# Altium PCB Ethernet-Module.PcbDoc (part 2 of 2)
Units mm, origin at the board's own origin, x right, y up, seen from the top; angles counter-clockwise.
Board outline 33 x 53 mm, 2 copper layers (Top Layer, Bottom Layer), stack 0.97 mm thick; 59 components, 47 nets, 237 pads, 62 vias.
Unrouted connection lines stored in the file: 33.
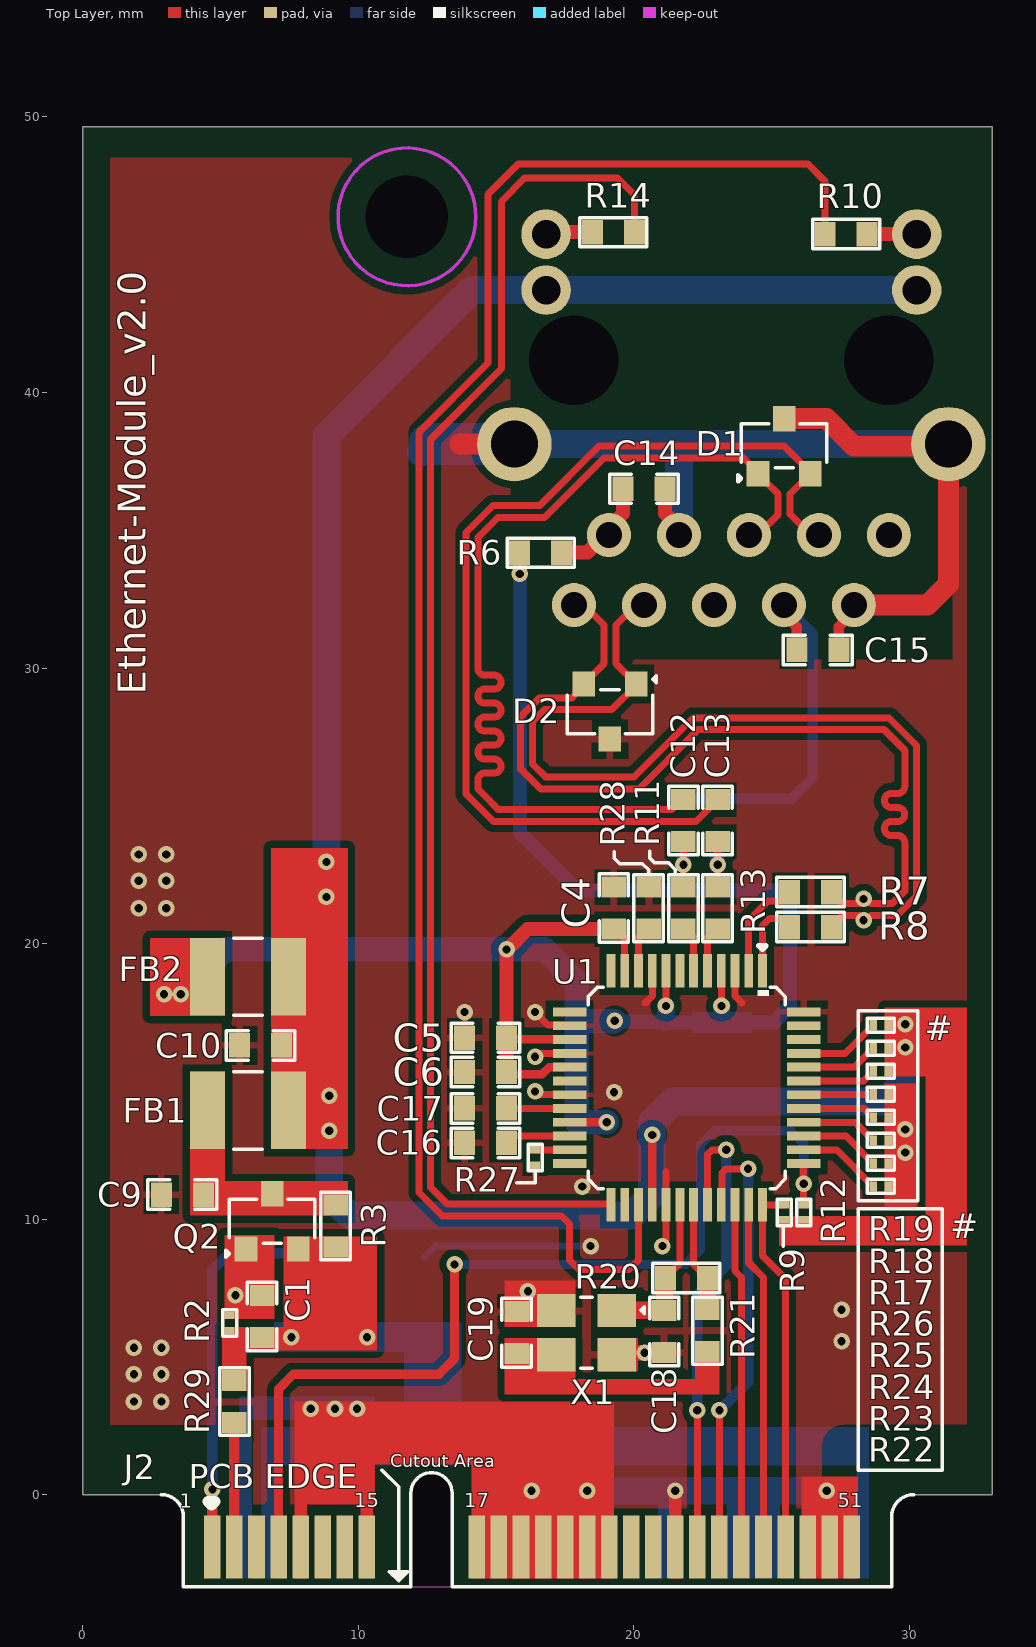
[diagram p0: Top Layer view]

## Via types
v1: diameter 0.6, hole 0.3, Top Layer to Bottom Layer, 62 vias

## Nets (pads, with @x,y where several pads share a name; then routed paths per layer and width w, separated by ;. In a path a pad name is that pad's centre, name@x,y a point inside that pad or via, vN(x,y) a via of type N, cw(c..) or ccw(c..) an arc to the next point about the centre after c; other vN are vias at no path point) (continued)
NetC12_2: C12.2 R11.1 R16.2 | length 2.5
  Top Layer w0.254: R11.1 v1(21.793,22.86) C12.2 C12.2@21.793,23.724
  Bottom Layer w0.508: v1(21.793,22.86) R16.2
NetC13_2: C13.2 R13.1 R15.2 | length 2.5
  Top Layer w0.254: R13.1 v1(23.038,22.86) C13.2 C13.2@23.038,23.724
  Bottom Layer w0.508: v1(23.038,22.86) R15.2
NetC16_2: C16.2 U1.22 | length 2.4
  Top Layer w0.254: C16.2 15.376,12.787 15.605,13.016 U1.22
NetC17_2: C17.2 U1.20 | length 2.3
  Top Layer w0.254: C17.2 U1.20
NetC18_2: C18.2 R20.1 U1.30 X1.1 | length 5.8
  Top Layer w0.254: R20.1 21.138,7.922 21.392,8.176 21.456,8.176 21.665,8.385 U1.30
  Top Layer w0.33: X1.1 X1.1@19.39,6.69 ; C18.2 C18.2@21.118,6.711 ; R20.1@21.118,7.838 R20.1
  Top Layer w0.635: X1.1@19.39,6.69 C18.2 ; C18.2@21.118,6.711 R20.1@21.118,7.838
NetC19_2: C19.2 R21.1 X1.3 | length 1.5
  Top Layer w0.254: C19.2 17.139,5.115 X1.3
NetQ1_1: Q1.1 R30.2
NetQ1_3: Q1.3 R1.2
NetR7_2: R7.2 U1.2 | length 3.8
  Top Layer w0.254: U1.2 24.165,20.844 24.87,21.549 25.391,21.549 25.645,21.803 R7.2
NetR8_2: R8.2 U1.1 | length 2.9
  Top Layer w0.254: U1.1 24.665,20.663 24.915,20.914 25.391,20.914 25.645,20.66 R8.2
NetR11_2: R11.2 U1.6 | length 1.7
  Top Layer w0.254: R11.2 21.857,20.523 22.165,20.215 U1.6
NetR13_2: R13.2 U1.5 | length 1.7
  Top Layer w0.254: U1.5 22.665,20.214 22.974,20.523 R13.2
NetR17_2: R17.2 U1.43 | length 2.7
  Top Layer w0.254: U1.43 28.332,15.016 28.623,15.306 28.673,15.306 28.681,15.314 R17.2
NetR18_2: R18.2 U1.44 | length 2.8
  Top Layer w0.254: U1.44 27.997,15.516 28.623,16.142 28.673,16.142 28.681,16.15 R18.2
NetR19_2: R19.2 U1.45 | length 3
  Top Layer w0.254: U1.45 27.661,16.016 28.623,16.978 28.673,16.978 28.681,16.986 R19.2
NetR20_2: R20.2 R21.2 U1.31 | length 4
  Top Layer w0.254: U1.31 22.165,8.356 22.345,8.176 22.408,8.176 22.662,7.922 R20.2
  Top Layer w0.635: R21.2 R20.2
NetR22_1: R22.1 U1.38 | length 3.1
  Top Layer w0.254: U1.38 26.174,12.506 27.361,12.506 28.623,11.244 28.673,11.244 28.681,11.236 R22.1
NetR23_1: R23.1 U1.39 | length 3
  Top Layer w0.254: U1.39 27.687,13.016 28.623,12.08 28.673,12.08 28.681,12.072 R23.1
NetR24_2: R24.2 U1.40 | length 2.8
  Top Layer w0.254: U1.40 28.023,13.516 28.623,12.916 28.673,12.916 28.681,12.908 R24.2
NetR25_1: R25.1 U1.41 | length 2.7
  Top Layer w0.254: U1.41 28.359,14.016 28.623,13.751 28.673,13.751 28.681,13.743 R25.1
NetR26_1: R26.1 U1.42 | length 2.5
  Top Layer w0.254: U1.42 R26.1@28.681,14.516
NetR27_2: R27.2 U1.23 | length 1.3
  Top Layer w0.254: R27.2@16.409,12.516 U1.23
NetR28_2: R28.2 U1.10 | length 1.7
  Top Layer w0.254: U1.10 20.165,20.221 20.467,20.523 R28.2
RD_N: C13.1 D1.2 J1.3 | length 36.8
  Top Layer w0.254: C13.1 22.974,25.222 22.72,24.968 22.72,24.905 22.543,24.727 22.543,24.715 22.255,24.427 14.902,24.427 13.903,25.425 13.903,34.923 14.881,35.901 16.581,35.901 18.733,38.053 25.447,38.053 26.401,37.099 26.401,36.999 26.118,36.716 26.068,36.716 25.667,36.315 25.667,35.597 26.438,34.826 J1.3
RD_P: C12.1 D1.1 J1.5 | length 36.8
  Top Layer w0.254: C12.1 21.73,25.222 21.366,24.859 15.081,24.859 14.514,25.425 14.335,25.604 14.335,25.933 cw(c14.589,25.933) 14.589,26.187 14.92,26.187 ccw(c14.92,26.441) 14.92,26.695 14.589,26.695 cw(c14.589,26.949) 14.589,27.203 14.92,27.203 ccw(c14.92,27.457) 14.92,27.711 14.589,27.711 cw(c14.589,27.965) 14.589,28.219 14.92,28.219 ccw(c14.92,28.473) 14.92,28.727 14.589,28.727 cw(c14.589,28.981) 14.589,29.235 14.92,29.235 ccw(c14.92,29.489) 14.92,29.743 14.589,29.743 cw(c14.589,29.997) 14.335,29.997 14.335,30.527 14.335,34.744 15.06,35.469 16.76,35.469 18.912,37.621 23.979,37.621 24.784,36.816 24.784,36.716 24.834,36.716 25.235,36.315 25.235,35.574 24.487,34.826 J1.5
TD_N: D2.1 J1.8 R5.1 R8.1 | length 35.8
  Top Layer w0.254: J1.8 20.063,32.286 19.342,31.565 19.342,30.157 19.743,29.756 19.793,29.756 20.076,29.473 D2.1 20.076,29.373 19.193,28.489 16.756,28.489 16.322,28.055 16.322,26.52 16.797,26.046 20,26.046 22.147,28.193 29.261,28.193 30.259,27.195 30.259,25.886 30.259,21.728 29.547,21.015 28.599,21.015 28.426,20.842 v1(28.332,20.842) 28.159,21.015 27.524,21.015 27.169,20.66 R8.1
  Bottom Layer w0.254: R5.1 27.191,20.63 27.589,21.028 28.147,21.028 v1(28.332,20.842)
TD_P: D2.2 J1.10 R4.1 R7.1 | length 35.9
  Top Layer w0.254: J1.10 18.185,32.286 18.727,31.745 18.731,31.745 18.91,31.565 18.91,30.157 18.509,29.756 18.459,29.756 17.893,29.19 17.893,29.07 17.744,28.921 16.578,28.921 15.891,28.234 15.891,26.341 16.618,25.614 20.179,25.614 22.326,27.761 29.082,27.761 29.827,27.016 29.827,26.183 29.827,25.702 cw(c29.573,25.702) 29.573,25.448 29.339,25.448 ccw(c29.339,25.194) 29.339,24.94 29.573,24.94 cw(c29.573,24.686) 29.573,24.432 29.339,24.432 ccw(c29.339,24.178) 29.339,23.924 29.573,23.924 cw(c29.573,23.67) 29.827,23.67 29.827,23.543 29.827,21.907 29.368,21.447 28.599,21.447 28.426,21.62 v1(28.332,21.62) 28.159,21.447 27.524,21.447 27.169,21.803 R7.1
  Bottom Layer w0.254: R4.1 27.191,21.858 27.589,21.46 28.172,21.46 v1(28.332,21.62)
TYPE0: J2.3 R29.1 | length 4.5
  Top Layer w0.381: J2.3 R29.1
VDD: C10.2 C11.2 FB1.2 FB2.1 J1.11 J1.13 R9.1 R12.1 R17.1 R18.1 R19.1 U1.28 | length 73.3
  Top Layer w0.254: U1.28@20.662,10.518 U1.28
  Top Layer w0.305: v1(20.66,13.054) 20.662,13.052 U1.28@20.662,10.518
  Bottom Layer w1.016: v1(8.839,21.692) v1(8.839,22.962) 8.839,38.43 14.125,43.716 J1.13 J1.11 ; v1(8.941,14.481) 8.941,10.879 9.685,10.135 19.916,10.135 20.66,10.879 v1(20.66,13.054) 20.66,13.531 21.404,14.275 29.101,14.275 29.845,15.019 v1(29.845,16.231) v1(29.845,17.069)
  other v1: 8.941,13.211
VDDA: C2.2 C3.2 C4.2 C5.2 C6.2 C7.2 C8.2 FB2.2 R4.2 R5.2 R6.2 U1.4 U1.8 U1.11 U1.15 U1.17 U1.21 | length 74.9
  Top Layer w0.254: C4.2 19.33,20.523 19.665,20.188 U1.11 ; v1@21.162,17.994 21.162,19.013 U1.8 ; U1.4 23.171,19.01 v1@23.171,18.004
  Top Layer w0.305: C6.2 15.453,15.263 16.67,15.263 16.915,15.508 17.657,15.508 U1.17 ; C5.2@15.437,16.523 17.657,16.523 U1.15 ; U1.21 U1.21 v1@19.012,13.514
  Top Layer w0.381: R6.2 R6.2@15.855,34.184 ; v1@15.855,33.419 v1(15.857,33.417)
  Top Layer w0.508: C6.2 C5.2 v1(15.376,19.787) 15.401,19.787 16.138,20.523 C4.2 ; v1@15.855,33.419 R6.2@15.855,34.184
  Bottom Layer w0.508: v1(15.857,33.417) 15.857,24.021 17.957,21.921 R4.2 R5.2 25.667,17.737 25.075,17.145 C8.2 23.207,17.145 ; v1@19.286,17.178 v1(19.304,17.196) 19.322,17.178 21.125,17.178 C3.2 C2.2 23.207,17.145 ; v1(23.176,17.737) v1@23.194,17.719 ; 23.194,17.158 23.207,17.145
  Bottom Layer w0.635: C3.2 v1(21.159,17.737) ; 23.194,17.158 v1@23.194,17.719
  Bottom Layer w0.889: v1(2.946,18.161) v1(3.549,18.161) 5.175,19.787 v1(15.376,19.787) 16.739,19.787 17.92,18.605 17.92,17.178 ; C7.2@17.92,13.524 17.92,17.178 ; C7.2@17.96,13.513 v1(19.012,13.513) ; v1@19.286,17.178 17.92,17.178
W5500_CS: J2.37 U1.32 | length 17.4
  Top Layer w0.254: J2.37 v1(22.3,3.064) ; U1.32 22.665,12.356 22.825,12.516 v1(23.347,12.516)
  Bottom Layer w0.381: v1(22.3,3.064) 22.3,7.267 23.347,8.313 v1(23.347,12.516)
W5500_INT: J2.45 R9.2 U1.36 | length 13.5
  Top Layer w0.254: R9.2 24.669,10.52 U1.36 24.665,8.672 25.5,7.837 J2.45
W5500_MISO: J2.41 U1.34 | length 12.5
  Top Layer w0.254: U1.34 23.665,8.121 23.9,7.886 J2.41
W5500_MOSI: J2.43 U1.35 | length 12.6
  Top Layer w0.254: U1.35 24.165,8.416 24.7,7.88 J2.43
W5500_PWR_EN: J2.1 R30.1 | length 14.3
  Top Layer w0.381: J2.1 v1(4.7,0.191)
  Bottom Layer w0.381: v1(4.7,0.191) 4.7,8.143 5.316,8.759 R30.1@8.727,8.759
W5500_RST: J2.7 R12.2 U1.37 | length 36.2
  Top Layer w0.254: R12.2 26.16,11.288 26.16,12.011 U1.37 26.229,12.016 U1.37@26.262,11.983
  Top Layer w0.33: J2.7 7.1,3.832 7.637,4.369 12.917,4.369 13.487,4.939 v1(13.487,8.357)
  Bottom Layer w0.33: v1(13.487,8.357) 21.869,8.357 22.415,8.903 22.415,12.701 22.922,13.208 25.696,13.208 26.162,12.742 v1(26.162,11.288)
W5500_SCLK: J2.39 U1.33 | length 16.3
  Top Layer w0.254: J2.39 v1(23.1,3.064) ; U1.33 23.198,10.549 23.198,11.679 23.347,11.828 v1(24.139,11.828)
  Bottom Layer w0.381: v1(23.1,3.064) 23.49,3.454 23.497,3.454 24.139,4.096 v1(24.139,11.828)
pads on no net: J1.1 J1.6 J1.MH1 J1.MH2 J2.2 J2.5 J2.8 J2.10 J2.11 J2.12 J2.13 J2.14 J2.16 J2.20 J2.22 J2.30 J2.31 J2.32 J2.33 J2.36 J2.38 J2.46 J2.48 U1.7 U1.12 U1.13 U1.18 U1.24 U1.26 U1.46 U1.47

## Polygon pours and split planes (outlines as drawn)
GND on Top Layer "GND_L01_P000" (solid, remove dead copper, pour order 0): 0.991,2.54 5.39,2.54 cw(c5.39,1.74) 6.19,1.74 6.19,-0.355 9.361,-0.356 9.361,0.051 9.363,0.051 cw(c12.651,0.05) 15.939,0.05 15.939,-0.737 15.926,-0.737 26.81,-0.737 26.81,1.74 cw(c27.61,1.74) 27.61,2.54 32.08,2.54 32.08,48.514 0.991,48.514
GND on Bottom Layer "GND_L02_P001" (solid, remove dead copper, pour order 1): 0.991,2.54 5.39,2.54 cw(c5.39,1.74) 6.19,1.74 6.19,-0.815 9.348,-0.815 9.361,-0.815 9.361,0.051 9.363,0.051 cw(c12.651,0.05) 15.939,0.05 15.939,-0.737 15.926,-0.737 26.81,-0.737 26.81,1.74 cw(c27.61,1.74) 27.61,2.54 32.08,2.54 32.08,48.514 0.991,48.514

## Keep-outs
Keep-Out Layer:
  circle w0.127: c11.759,46.376 r2.5

## Other copper
Top Layer:
  rectangle net GND: 7.676,1.092 19.279,3.378
  region net 3V3: 10.67,5.232 10.67,9.373 7.278,9.373 7.278,5.232
  rectangle net GND: 7.676,-3.05 8.133,0.191
  rectangle net VDD: 25.261,9.051 32.08,10.105
  rectangle net VDD: 30.582,9.051 32.08,17.374
  rectangle net VDDA: 2.438,17.374 5.156,20.201
  rectangle net 3V3: 5.055,5.232 7.818,6.088
  rectangle net 3V3: 5.055,3.759 5.944,6.088
  rectangle net VDD: 6.828,12.54 9.616,23.47
  rectangle net NetC19_2: 15.293,4.734 17.577,5.496
  rectangle net NetC19_2: 15.293,3.735 17.877,5.677
  rectangle net GND: 15.293,6.077 17.877,7.772
  rectangle net VDD: 25.261,9.051 26.345,10.105
  rectangle net GND: 26.071,-3.05 28.124,0.66
  rectangle net GND: 29.096,10.364 30.246,14.92
  rectangle net VDD: 29.096,15.179 32.08,17.676
  rectangle net NetC19_2: 22.218,3.735 23.107,5.573
  rectangle net NetC19_2: 15.293,3.632 23.107,4.191
  rectangle net GND: 18.754,4.477 20.154,5.677
  rectangle net NetC9_2: 3.886,10.131 5.156,15.35
  rectangle net NetC9_2: 3.886,10.131 9.616,11.375
  rectangle net NetC1_1: 5.138,8.455 6.328,9.375
  rectangle net NetC1_1: 5.138,6.368 6.947,9.423
  rectangle net 3V3: 5.138,5.329 6.947,6.088
  rectangle net 3V3: 7.408,8.455 10.67,9.375
  rectangle net GND: 15.6,-0.356 19.279,0.191
  rectangle net GND: 14.102,-3.05 19.279,1.321
  rectangle net GND: 21.276,-3.05 21.733,0.142
  rectangle net GND: 15.6,-3.05 16.2,0.191
  rectangle net GND: 7.676,-0.356 10.6,3.378
  rectangle net GND: 10.076,-3.05 10.533,0.191
  pour cut-out: 15.51,49.642 31.562,49.642 31.562,30.305 15.51,30.305
Bottom Layer:
  rectangle net NetC1_1: 5.283,6.799 6.531,7.688
  rectangle net NetQ1_3: 7.293,6.794 8.865,7.688
  rectangle net VDDA: 22.122,16.764 24.291,17.526
  rectangle net NetQ1_1: 9.565,7.389 10.026,9.081
  rectangle net 3V3: 16.876,-3.05 17.333,2.159
  rectangle net 3V3: 6.476,-3.05 6.933,2.464
  rectangle net 3V3: 28.076,-3.05 28.533,2.184
  rectangle net 3V3: 6.502,1.067 28.524,2.464
  rectangle net GND: 5.676,-3.05 6.133,3.182
  rectangle net 3V3: 11.646,1.26 13.741,6.274
  rectangle net 3V3: 6.933,5.182 12.94,6.274
  rectangle net GND: 5.676,2.718 10.592,3.556
  rectangle net GND: 17.702,-0.363 27.733,0.635
  rectangle net GND: 27.276,-3.05 27.733,0.191
  rectangle net GND: 20.876,-3.05 21.333,0.191
  rectangle net GND: 23.368,-3.05 25.298,0.191
  region net GND: 23.8,0.191 20.8,0.191 20.8,-0.363 23.8,-0.363
  rectangle net GND: 17.702,-3.05 18.872,0.635
  rectangle net GND: 14.476,-3.05 14.933,0.191
  rectangle net GND: 14.476,-0.363 16.6,0.635
  pour cut-out: 15.51,49.642 31.562,49.642 31.562,30.305 15.51,30.305

## Silkscreen, mask and mechanical layers (free items; w line width, h text height)
Top Overlay:
  lines w0.127: 15.754,11.328 16.409,11.328 16.409,11.754 ; 19.283,23.336 19.283,23.097 19.477,22.904 20.303,22.904 20.53,22.677 20.53,22.504 ; 20.578,23.343 20.578,23.105 20.757,22.926 20.794,22.926 21.256,22.926 21.502,22.681 21.502,22.504 21.488,22.504 ; 25.416,9.02 25.416,9.762 25.386,9.762 25.446,9.762 ; 28.145,0.893 31.191,0.893 31.191,10.37 28.145,10.37 28.145,0.893 ; 28.145,10.66 30.304,10.66 30.304,17.559 28.145,17.559 28.145,10.66
  text "Ethernet-Module_v2.0" at 2.286,29.032 h1.02 r90
  text "#" at 30.558,16.491 h0.89
  text "#" at 31.477,9.303 h0.89
Bottom Overlay:
  drawing of 21 lines, arcs and shapes, not listed
  text "ZERO CARBON FOOTPRINT" at 2.372,23.858 h1.02 r270
Board Outline:
  lines w0.254: 11.899,-3.35 3.65,-3.355 3.65,-0.8 ccw(c2.85,-0.8) 2.85,0 0,0 0,49.642 33,49.642 33,0 30.15,0 ccw(c30.15,-0.8) 29.35,-0.8 29.35,-3.355 13.399,-3.35 ; 11.899,-3.349 11.9,0.051 cw(c12.65,0.051) 13.4,0.051 13.399,-3.349
Fabrication:
  drawing of 191 lines, arcs and shapes, not listed
  text "Layer" at 45.348,52.172 h1.52
  text "Name" at 55.759,52.172 h1.52
  text "Material" at 79.375,52.172 h1.52
  text "Thickness" at 101.213,52.172 h1.52
  text "Constant" at 117.719,52.172 h1.52
  text "Board Layer Stack" at 132.193,52.172 h1.52
  text "Top Overlay" at 55.759,49.124 h1.52
  text "Top Solder" at 55.759,46.076 h1.52
  text "Solder Resist" at 79.375,46.076 h1.52
  text "0.59mil" at 101.213,46.076 h1.52
  text "3.5" at 117.719,46.076 h1.52
  text "1" at 45.348,43.028 h1.52
  text "Top Layer" at 55.759,43.028 h1.52
  text "1.38mil" at 101.213,43.028 h1.52
  text "Dielectric 1" at 55.759,39.98 h1.52
  text "FR-4" at 79.375,39.98 h1.52
  text "35.43mil" at 101.213,39.98 h1.52
  text "4.8" at 117.719,39.98 h1.52
  text "2" at 45.348,36.932 h1.52
  text "Bottom Layer" at 55.759,36.932 h1.52
  text "1.38mil" at 101.213,36.932 h1.52
  text "Bottom Solder" at 55.759,33.884 h1.52
  text "Solder Resist" at 79.375,33.884 h1.52
  text "0.59mil" at 101.213,33.884 h1.52
  text "3.5" at 117.719,33.884 h1.52
  text "Bottom Overlay" at 55.759,30.836 h1.52
Drill Drawing:
  circle w0.254: c2.556,76.12 r0.847
  lines w0.254: 1.709,64.266 2.133,64.266 2.133,63.843 2.979,63.843 2.979,64.266 3.403,64.266 3.403,65.113 2.979,65.113 2.979,65.536 2.133,65.536 2.133,65.113 1.709,65.113 1.709,64.266 ; 1.709,68.076 2.133,68.076 2.556,67.653 2.979,68.076 3.403,68.076 2.979,68.5 3.403,68.923 2.979,68.923 2.556,69.346 2.133,68.923 1.709,68.923 2.133,68.5 1.709,68.076 ; 1.709,71.463 3.403,71.463 3.403,73.156 1.709,73.156 1.709,71.463 ; 1.709,80.776 3.403,80.776 2.556,79.083 1.709,80.776 ; 1.709,82.893 1.709,83.316 2.133,83.74 1.709,84.163 1.709,84.586 2.133,84.586 2.556,84.163 2.979,84.586 3.403,84.586 3.403,84.163 2.979,83.74 3.403,83.316 3.403,82.893 2.979,82.893 2.556,83.316 2.133,82.893 1.709,82.893
  lines w0.381: 0.191,62.7 323.899,62.7 ; 0.191,85.56 323.899,85.56 ; 14.183,58.89 14.183,89.37 ; 27.641,58.89 27.641,89.37 ; 56.843,58.89 56.843,89.37 ; 69.692,58.89 69.692,89.37 ; 88.331,58.89 88.331,89.37 ; 126.419,58.89 126.419,89.37 ; 141.401,58.89 141.401,89.37 ; 160.345,58.89 160.345,89.37 ; 176.85,58.89 176.85,89.37 ; 198.536,58.89 198.536,89.37 ; 232.409,58.89 232.409,89.37 ; 266.283,58.89 266.283,89.37 ; 288.273,58.89 288.273,89.37 ; 0.191,58.89 323.899,58.89 323.899,89.37 0.191,89.37 0.191,58.89
  text "Symbol" at 2.476,86.703 h1.83
  text "Count" at 15.326,86.703 h1.83
  text "Hole Size" at 28.784,86.703 h1.83
  text "Plated" at 57.986,86.703 h1.83
  text "Hole Type" at 70.835,86.703 h1.83
  text "Drill Layer Pair" at 89.474,86.703 h1.83
  text "Via/Pad" at 127.562,86.703 h1.83
  text "Pad Shape" at 142.544,86.703 h1.83
  text "Template" at 161.488,86.703 h1.83
  text "Description" at 177.993,86.703 h1.83
  text "Hole Tolerance (+)" at 199.679,86.703 h1.83
  text "Hole Tolerance (-)" at 233.552,86.703 h1.83
  text "Hole Length" at 267.426,86.703 h1.83
  text "Routed Path Length" at 289.416,86.703 h1.83
  text "1" at 15.326,82.893 h1.52
  text "3.000mm (118.11mil)" at 28.784,82.893 h1.52
  text "NPTH" at 57.986,82.893 h1.52
  text "Round" at 70.835,82.893 h1.52
  text "Top Layer - Bottom Layer" at 89.474,82.893 h1.52
  text "Pad" at 127.562,82.893 h1.52
  text "Rounded" at 142.544,82.893 h1.52
  text "c0hn300" at 161.488,82.893 h1.52
  text "-" at 267.426,82.893 h1.52
  text "-" at 289.416,82.893 h1.52
  text "2" at 15.326,79.083 h1.52
  text "1.700mm (66.93mil)" at 28.784,79.083 h1.52
  text "PTH" at 57.986,79.083 h1.52
  text "Round" at 70.835,79.083 h1.52
  text "Top Layer - Bottom Layer" at 89.474,79.083 h1.52
  text "Pad" at 127.562,79.083 h1.52
  text "Rounded" at 142.544,79.083 h1.52
  text "c270h170" at 161.488,79.083 h1.52
  text "-" at 267.426,79.083 h1.52
  text "-" at 289.416,79.083 h1.52
  text "2" at 15.326,75.273 h1.52
  text "3.250mm (127.95mil)" at 28.784,75.273 h1.52
  text "NPTH" at 57.986,75.273 h1.52
  text "Round" at 70.835,75.273 h1.52
  text "Top Layer - Bottom Layer" at 89.474,75.273 h1.52
  text "Pad" at 127.562,75.273 h1.52
  text "Rounded" at 142.544,75.273 h1.52
  text "c0hn325" at 161.488,75.273 h1.52
  text "-" at 267.426,75.273 h1.52
  text "-" at 289.416,75.273 h1.52
  text "4" at 15.326,71.463 h1.52
  text "1.040mm (40.95mil)" at 28.784,71.463 h1.52
  text "PTH" at 57.986,71.463 h1.52
  text "Round" at 70.835,71.463 h1.52
  text "Top Layer - Bottom Layer" at 89.474,71.463 h1.52
  text "Pad" at 127.562,71.463 h1.52
  text "Rounded" at 142.544,71.463 h1.52
  text "c180h104" at 161.488,71.463 h1.52
  text "-" at 267.426,71.463 h1.52
  text "-" at 289.416,71.463 h1.52
  text "10" at 15.326,67.653 h1.52
  text "0.940mm (37.01mil)" at 28.784,67.653 h1.52
  text "PTH" at 57.986,67.653 h1.52
  text "Round" at 70.835,67.653 h1.52
  text "Top Layer - Bottom Layer" at 89.474,67.653 h1.52
  text "Pad" at 127.562,67.653 h1.52
  text "Rounded" at 142.544,67.653 h1.52
  text "c160h94" at 161.488,67.653 h1.52
  text "-" at 267.426,67.653 h1.52
  text "-" at 289.416,67.653 h1.52
  text "62" at 15.326,63.843 h1.52
  text "0.300mm (11.81mil)" at 28.784,63.843 h1.52
  text "PTH" at 57.986,63.843 h1.52
  text "Round" at 70.835,63.843 h1.52
  text "Top Layer - Bottom Layer" at 89.474,63.843 h1.52
  text "Via" at 127.562,63.843 h1.52
  text "Rounded" at 142.544,63.843 h1.52
  text "v60h30" at 161.488,63.843 h1.52
  text "-" at 267.426,63.843 h1.52
  text "-" at 289.416,63.843 h1.52
  text "81 Total" at 15.326,60.033 h1.52

## Dimensions
33,49.642 to 0,49.642 on Dimensions
33,49.642 to 29.35,-3.355 on Dimensions

## Text inside footprints (layer, text, board x,y; h text height)
J1: Bottom Overlay "PCB Edge" at 25.806,48.716 h1.52
J2: Top Overlay "15" at 9.839,-0.642 h0.89; Top Overlay "17" at 13.839,-0.642 h0.89; Top Overlay "Cutout Area" at 11.159,0.829 h0.8; Top Overlay "1" at 3.515,-0.653 h0.89; Top Overlay "51" at 27.395,-0.642 h0.89; Top Overlay "PCB EDGE" at 3.836,-0.05 h1.5